# Altium PCB DIO_8SMA_8MCX.PcbDoc (part 7 of 9)
Units mm, origin at the board's own origin, x right, y up, seen from the top; angles counter-clockwise.
Board outline 222.9 x 100 mm, 6 copper layers (TopLayer, L2, L3, L4, L5, Bottom Layer), stack 1.492 mm thick; 542 components, 326 nets, 1968 pads, 1583 vias.
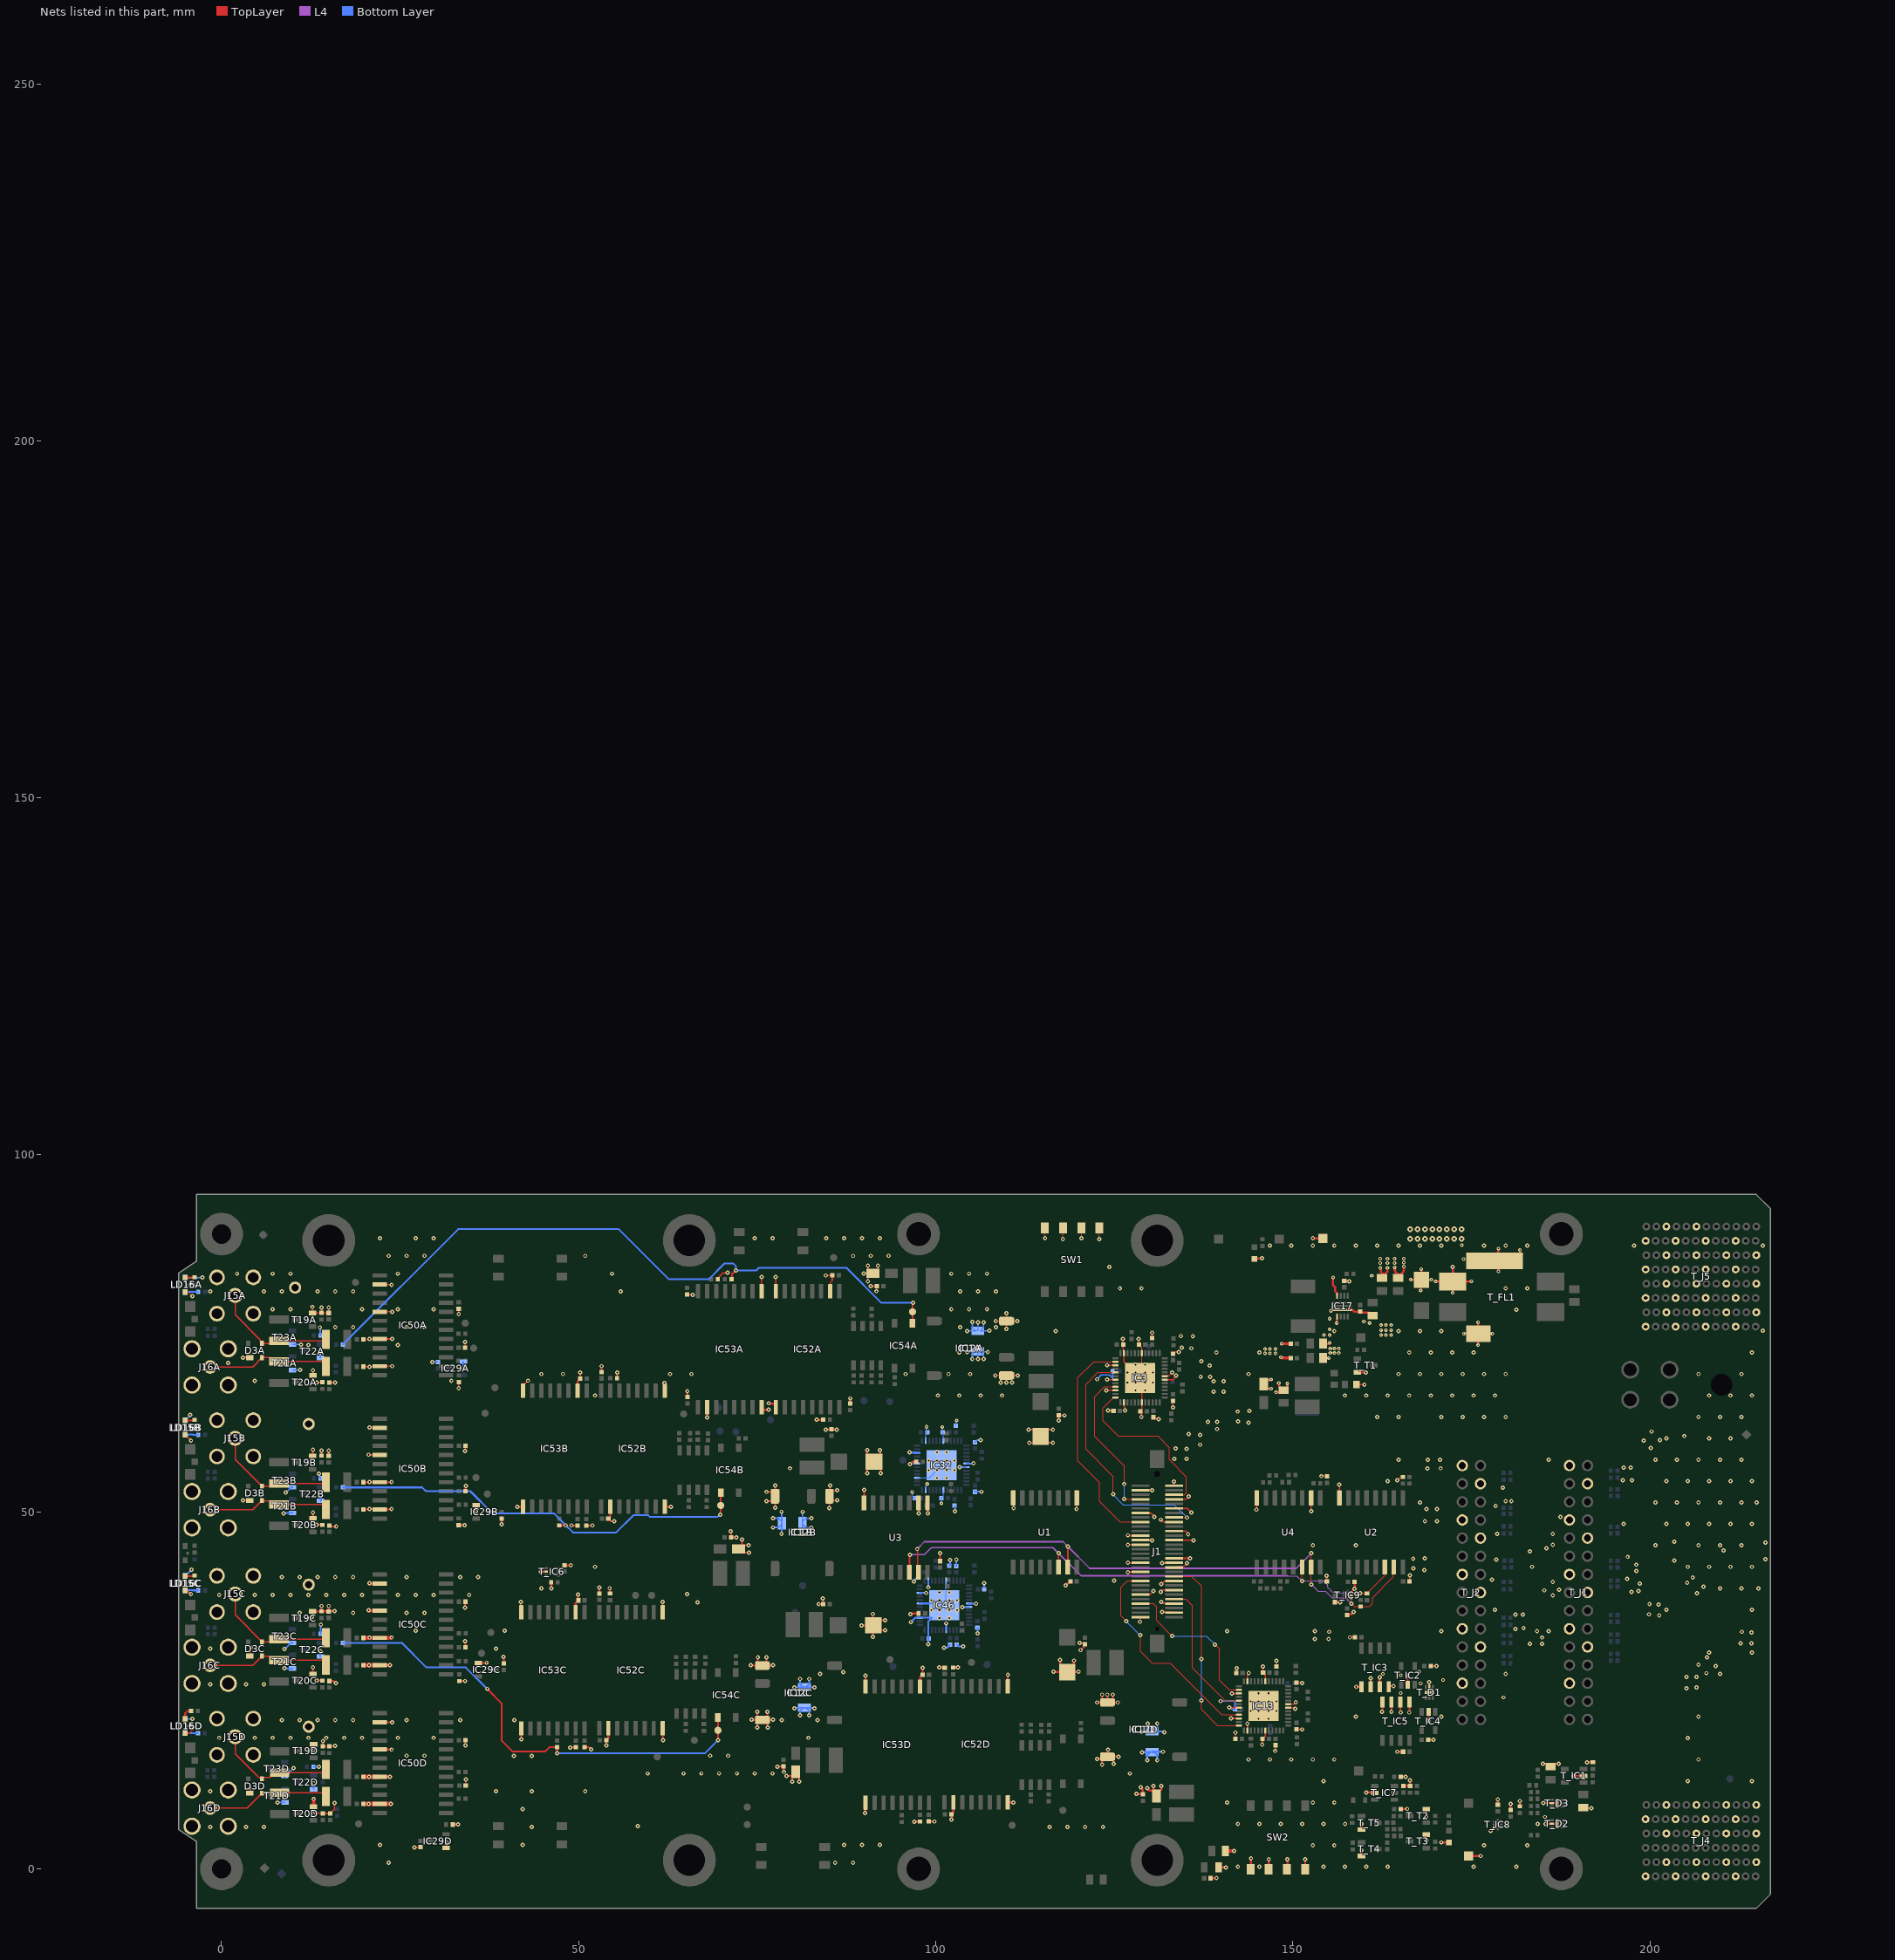
[diagram p10: the nets of this part, all layers, seen from the top]

## Via types
v1: diameter 0.6, hole 0.25, TopLayer to Bottom Layer, tented both sides, 1359 vias
v2: diameter 0.5, hole 0.2, TopLayer to Bottom Layer, tented both sides, 127 vias
v3: diameter 0.6, hole 0.3, TopLayer to Bottom Layer, tented both sides, 45 vias
v4: diameter 0.8, hole 0.3, TopLayer to Bottom Layer, tented both sides, 40 vias
v5: diameter 0.5, hole 0.25, TopLayer to Bottom Layer, tented both sides, 12 vias

## Nets (pads, with @x,y where several pads share a name; then routed paths per layer and width w, separated by ;. In a path a pad name is that pad's centre, name@x,y a point inside that pad or via, vN(x,y) a via of type N, cw(c..) or ccw(c..) an arc to the next point about the centre after c; other vN are vias at no path point) (continued)
GND: C1.2 C2.1 C3.1 C15.1 C16.1 C17.1 C18.1 C19.1 C20.1 C21.1 C22.1 C23.1 C24.1 C25.1 C26.1 C27.1 C39A.2 C39B.2 C39C.2 C39D.2 C41A.1 C41B.1 C41C.1 C41D.1 C54.1 C55.1 C64.1 C65.1 C75.1 C77A.1 C77B.1 C77C.1 C77D.1 C78A.1 C78B.1 C78C.1 C78D.1 C80.1 C81.1 C82.1 C83.1 C84.1 C85.2 C86.1 C87.1 C92.1 C96.1 C97.1 C106.1 C107.1 C108.1 C109.1 C110.1 C111.1 C112.1 C113.1 C114.1 C115.1 C116.1 C117.1 C118.1 IC1A.1 IC1B.1 IC1C.1 IC1D.1 IC3.6 IC3.7 IC3.18 IC3.23 IC3.27 IC3.31 IC3.34 IC3.38 IC3.43 IC3.49 IC12A.1 IC12B.1 IC12C.1 IC12D.1 IC13.6 IC13.7 IC13.18 IC13.23 IC13.27 IC13.31 IC13.34 IC13.38 IC13.43 IC13.49 IC17.3 IC17.4 IC17.11 IC32.6 IC32.7 IC32.18 IC32.23 IC32.27 IC32.31 IC32.34 IC32.38 IC32.43 IC32.49 IC46.6 IC46.7 IC46.18 IC46.23 IC46.27 IC46.31 IC46.34 IC46.38 IC46.43 IC46.49 IC52A.9 IC52B.9 IC52C.9 IC52D.9 IC53A.2 IC53A.8 IC53B.2 IC53B.8 IC53C.2 IC53C.8 IC53D.2 IC53D.8 J1.2 J1.3 J1.8 J1.12 J1.13 J1.18 J1.22 J1.23 J1.25 J1.26 J1.27 J1.34 J1.35 J1.36 J1.38 J1.39 J1.44 J1.48 J1.49 J1.54 J1.58 J1.59 R5.2 R26.2 R53.1 R56.1 R61.2 R69A.1 R69B.1 R69C.1 R69D.1 R86.1 R103.2 R209A.2 R209B.2 R209C.2 R209D.2 SW1.5 SW1.6 SW1.7 SW1.8 SW2.1 SW2.2 SW2.3 SW2.4 T_C1.1 T_C2.1 T_C3.1 T_C4.1 T_C5.1 T_C6.1 T_C8.1 T_C9.1 T_C10.1 T_C12.2 T_C13.2 T_C16.1 T_C20.1 T_C22.1 T_C23.1 T_C24.1 T_C25.1 T_D1.2 T_D1.7 T_D2.2 T_D2.7 T_D3.2 T_D3.7 T_D5.2 T_FL1.4 T_IC1.2 T_IC2.2 T_IC3.1 T_IC3.2 T_IC3.3 T_IC3.4 T_IC4.2 T_IC5.1 T_IC5.2 T_IC5.3 T_IC5.4 T_IC6.2 T_IC7.2 T_IC8.4 T_IC9.4 T_J1.1 T_J1.4 T_J1.7 T_J1.10 T_J1.13 T_J1.16 T_J1.19 T_J1.22 T_J1.25 T_J2.1 T_J2.4 T_J2.7 T_J2.10 T_J2.13 T_J2.16 T_J2.19 T_J2.22 T_J2.25 T_J4.A2 T_J4.A4 T_J4.A6 T_J4.C1 T_J4.C5 T_J4.D2 T_J4.D4 T_J4.D6 T_J4.F1 T_J4.F5 T_J4.G2 T_J4.G4 T_J4.G6 T_J4.I1 T_J4.I5 T_J4.J2 T_J4.J4 T_J4.J6 T_J4.L1 T_J4.L5 T_J5.A2 T_J5.A4 T_J5.A6 T_J5.C1 T_J5.C3 T_J5.C5 T_J5.C7 T_J5.D2 T_J5.D4 T_J5.D6 T_J5.F1 T_J5.F3 T_J5.F5 T_J5.F7 T_J5.G2 T_J5.G4 T_J5.G6 T_J5.G8 T_J5.I1 T_J5.I3 T_J5.I5 T_J5.I7 T_J5.J2 T_J5.J4 T_J5.J6 T_J5.J8 T_J5.L1 T_J5.L3 T_J5.L5 T_J5.L7 T_LD3.1 T_LD4.1 T_R7.1 T_R19.1 T_R25.1 T_R26.2 T_R27.2 T_R30.1 T_R69.1 T_T1.2 T_T2.2 T_T3.2 T_T4.2 T_T5.2 T_TP5.1 T_TP6.1 U1.1 U1.8 U2.8 U3.1 U3.2 U3.8 U4.2 U4.8 | length 399.5
  TopLayer w0.15: SW1.8@115.29,89.75 115.29,88.31 v1(115.3,88.3) ; v1(117.8,88.2) 117.8,89.72 SW1.7@117.83,89.75 ; SW1.6@120.37,89.75 120.4,89.72 v1(120.4,88.3) ; v1(122.9,88.2) 122.9,89.74 SW1.5@122.91,89.75 ; IC3.49@128.858,69.017 IC3.18@128.858,72.217 128.858,72.961
  TopLayer w0.2: IC53B.8@42.223,66.957 42.423,67.157 42.423,67.887 v1(42.914,68.378) ; v1(65.212,66.9) 65.24,66.872 C78A.1@65.24,66.078 ; IC53A.2@67.984,65.142 67.992,65.134 67.992,63.208 v1(68,63.2) ; v1(85.1,50.5) 85.128,50.528 IC12B.1@85.128,52.1 ; IC12B.1@85.128,52.229 IC12B.1@85.128,52.1 ; IC12B.1@85.128,52.491 IC12B.1@85.2,52.563 ; IC12B.1@85.2,52.491 IC12B.1@85.2,52.563 ; v1(85.2,53.7) IC12B.1@85.2,52.563 ; v1(86.2,51.6) 85.628,51.6 IC12B.1@85.128,52.1 ; v1(86.2,53) 86.191,52.991 85.628,52.991 IC12B.1@85.2,52.563 ; v1(108.337,69.083) 108.35,69.095 109.6,69.095 109.1,68.595 v1(109.1,68.1) ; IC12A.1@109.845,69.095 109.9,69.04 v1(109.9,68.1) ; v1(110.7,68.1) 110.645,68.155 110.645,68.595 110.145,69.095 111.495,69.095 v1(111.5,69.1) ; U1.8@110.855,51.95 110.877,51.927 110.877,50.523 v1(110.9,50.5) ; v1(119.7,50.4) 119.734,50.434 119.734,51.939 U1.1@119.745,51.95 ; v1(123.9,67) 123.917,67.017 IC3.34@125.158,67.017 ; v1(124.002,70.525) 124.01,70.517 IC3.27@125.158,70.517 ; v1(124.02,68.543) 124.046,68.517 IC3.31@125.158,68.517 ; v1(124.1,64.2) 124.112,64.188 124.842,64.188 C108.1@124.888,64.142 ; v1(126.2,74.2) 126.224,74.176 126.224,73.426 C107.1@126.25,73.4 126.25,72.652 126.358,72.544 IC3.23@126.358,72.217 126.358,71.017 IC3.49@128.608,68.767 ; IC3.38@126.358,65.317 126.358,64.766 126.49,64.635 126.49,64.243 v1(126.518,64.215) ; v1(126.9,41.56) 126.932,41.593 J1.39@128.65,41.593 ; v1(126.9,42.9) 126.934,42.866 128.647,42.866 J1.35@128.65,42.863 ; v1(126.9,45.4) 126.902,45.403 J1.27@128.65,45.403 ; v1(126.9,46.7) 126.928,46.673 J1.23@128.65,46.673 ; v1(128.4,74.2) 128.424,74.176 128.424,73.426 C106.1@128.45,73.4 128.82,73.03 128.82,72.999 128.858,72.961 ; v1(128.6,34.6) 128.602,34.602 128.602,35.194 J1.59@128.65,35.243 ; J1.49@128.65,38.418 128.691,38.458 130.058,38.458 v1(130.5,38.9) ; J1.25@128.65,46.038 128.669,46.019 130.281,46.019 v1(130.3,46) ; J1.13@128.65,49.848 128.673,49.824 130.143,49.824 130.616,49.351 v1(130.616,49.309) ; J1.3@128.65,53.023 128.661,53.011 130.289,53.011 v1(130.3,53) ; C109.1@128.65,64.1 128.858,64.308 IC3.43@128.858,65.317 128.858,68.517 IC3.49@128.608,68.767 ; IC3.49@128.858,69.017 IC3.49@128.608,68.767 ; C92.1@130.287,74.319 130.295,74.326 130.295,75.095 v1(130.3,75.1) ; v1(131.497,38.774) 131.521,38.774 131.8,39.053 J1.48@133.35,39.053 ; v1(131.5,48.9) 131.823,48.578 J1.18@133.35,48.578 ; v1(131.6,37.4) 131.649,37.4 131.902,37.148 J1.54@133.35,37.148 ; v1(131.6,39.894) 131.6,39.9 131.962,40.262 133.289,40.262 J1.44@133.35,40.323 ; v1(131.7,36) 131.761,35.939 133.289,35.939 J1.58@133.35,35.878 ; v1(131.7,42.8) 131.731,42.831 133.319,42.831 J1.36@133.35,42.863 ; IC3.6@132.058,68.517 133.217,68.517 133.564,68.864 133.564,68.998 v1(133.64,69.074) ; IC3.7@132.058,69.017 132.617,69.017 v1(133.1,69.5) ; v1(133.2,64.6) C64.1@133.2,65.55 ; C65.1@133.2,72.15 133.41,72.36 133.487,72.36 133.527,72.4 v1(134,72.4) ; v1(133.33,54.257) 133.33,53.677 J1.2@133.35,53.658 ; J1.38@133.35,42.228 133.425,42.303 134.7,42.303 v1@135.198,42.8 ; J1.34@133.35,43.498 135.598,43.498 v1(135.6,43.5) ; J1.26@133.35,46.038 136.062,46.038 v1(136.1,46) ; J1.22@133.35,47.308 133.354,47.304 134.996,47.304 135.255,47.045 135.255,46.936 v1(135.332,46.859) ; J1.12@133.35,50.483 135.217,50.483 v1(135.8,49.9) ; J1.8@133.35,51.753 133.363,51.766 135.066,51.766 135.404,52.104 v1(135.404,52.16) ; v1(141.119,22.619) 141.169,22.569 IC13.31@142.45,22.569 ; v1(141.361,21.074) 142.445,21.074 IC13.34@142.45,21.069 ; v1(141.477,24.539) 142.049,24.539 142.06,24.55 142.431,24.55 IC13.27@142.45,24.569 ; v1(141.965,19.087) 141.969,19.084 C116.1@141.969,18.219 ; C115.1@142.069,27.419 142.154,27.504 v1(142.154,28.084) ; v1(143.639,20.35) 143.669,20.319 143.669,19.388 IC13.38@143.65,19.369 ; IC13.23@143.65,26.269 143.65,27.166 143.825,27.342 v1(143.825,27.45) ; v1(144.9,50.3) 144.955,50.355 U4.8@144.955,51.95 ; v1(145.719,17.419) 145.743,17.443 145.743,18.193 C117.1@145.769,18.219 146.15,18.6 IC13.43@146.15,19.369 ; v1(145.819,28.319) 145.841,28.297 C114.1@145.841,27.466 146.15,27.157 IC13.18@146.15,26.269 ; v1(147.519,16.519) 147.538,16.538 147.538,17.271 C118.1@147.581,17.314 ; C113.1@147.677,28.358 147.719,28.401 v1(147.719,29.119) ; IC13.6@149.35,22.569 150.061,22.569 150.211,22.419 v1(150.319,22.419) ; IC13.7@149.35,23.069 150.102,23.069 150.352,23.319 v1(150.419,23.319) ; C111.1@150.519,19.569 150.544,19.543 151.294,19.543 v1(151.319,19.519) ; C112.1@150.519,26.069 150.544,26.043 151.294,26.043 v1(151.319,26.019) ; U4.2@152.575,51.95 152.575,50.125 v1(152.6,50.1) ; v1(154,55) 154.015,54.985 R86.1@154.808,54.985 ; v1(154.737,41.031) 154.758,41.01 154.758,40.236 C55.1@154.76,40.234 ; v1(156.5,53.8) 156.523,53.777 U2.8@156.523,51.95 ; R53.1@158.889,67.829 159.984,67.829 v1(160.013,67.8) ; v1(164.6,54.4) 164.978,54.778 165.305,54.778 R56.1@165.424,54.897 ; C2.1@166.35,40.282 166.368,40.3 v1(166.368,41.098) ; T_C1.1@190.7,8.6 190.8,8.5 v1(191.8,8.5) v1@191.807,8.493
  TopLayer w0.25: v1(41.9,37.4) 41.928,37.372 41.928,35.952 IC53C.8@41.955,35.925 ; IC53B.2@49.843,66.957 49.843,68.257 C78B.1@50.218,68.632 50.218,69.482 v1(50.2,69.5) ; v1(52.9,39.4) 52.926,39.374 C77C.1@52.926,38.563 ; C77B.1@53.2,69.583 v1(53.2,70.4) ; v1@54.361,39.28 54.361,38.609 R209C.2@54.4,38.57 ; v1(55.4,69.5) 55.4,68.87 R209B.2@55.47,68.8 ; IC52C.9@61.771,35.938 v1(61.771,37.361) ; v1(62,68.055) 62.022,68.033 62.022,66.98 IC52B.9@62.045,66.958 ; v1(74.1,28.5) 74.119,28.481 IC1C.1@75.475,28.481 ; v1(75.1,29.6) 75.1,28.856 IC1C.1@75.475,28.481 ; IC1C.1@75.729,28.481 IC12C.1@75.679,28.481 IC1C.1@75.475,28.481 ; v1(76.3,29.6) 76.3,28.856 75.925,28.481 77.181,28.481 v1(77.2,28.5) ; v1(83.6,37.1) C41C.1@84.25,37.1 84.225,37.125 84.225,37.848 v1(84.2,37.873) ; v1(89.6,34.1) C39C.2@91.25,34.1 ; U3.8@89.955,51.25 89.955,53.055 v1(90,53.1) ; IC53D.8@90.155,25.525 90.155,27.065 v1(90.158,27.068) ; v1(91.2,32.5) 91.2,34.05 C39C.2@91.25,34.1 ; v1(91.2,35.7) 91.2,34.15 C39C.2@91.25,34.1 ; v1(92.9,33.4) 91.95,33.4 C39C.2@91.25,34.1 ; v1(92.9,34.8) 91.95,34.8 C39C.2@91.25,34.1 ; v1(96.408,56.708) 96.411,56.708 96.717,57.014 R61.2@97.252,57.014 ; v1(96.446,35.666) 96.541,35.666 96.637,35.761 R103.2@97.576,35.761 ; U3.2@97.575,51.25 97.588,51.237 97.588,49.812 v1(97.6,49.8) ; IC53D.2@97.775,25.525 97.775,26.825 C78D.1@98.15,27.2 v1@98.15,28.139 ; U3.1@98.845,51.25 98.872,51.223 98.872,49.828 v1(98.9,49.8) ; v1(100.5,28.2) 100.509,28.191 101.241,28.191 C77D.1@101.25,28.183 ; C54.1@100.6,43.25 v1(100.6,44.2) ; R209D.2@102.458,28.197 102.46,28.198 103.098,28.198 v1(103.1,28.2) ; IC52D.9@110.095,25.558 110.095,27.195 v1(110.1,27.2) ; v1(113,61.5) 113.75,61.5 C39A.2@114.7,60.55 ; v1(113.1,59.7) 113.85,59.7 C39A.2@114.7,60.55 ; v1(116.4,59.7) 115.55,59.7 C39A.2@114.7,60.55 ; v1(116.4,61.5) 115.65,61.5 C39A.2@114.7,60.55 ; v1(117.2,62.8) C41A.1@117.2,63.55 117.225,63.525 117.975,63.525 v1(118,63.5) ; v1(118.189,39.695) 118.564,40.07 118.661,40.07 C75.1@118.846,40.255 ; v1(120.176,31.645) 120.243,31.578 120.715,31.578 120.801,31.492 120.751,31.443 120.751,31.062 120.322,30.632 v1(120.269,30.632) ; v1(122.6,23.3) IC1D.1@123.701,23.3 ; v1(123.3,24.4) 123.326,24.374 123.326,23.696 IC1D.1@123.701,23.321 ; v1(124.033,24.403) 124.054,24.381 IC1D.1@124.054,23.321 ; IC1D.1@124.408,23.3 v1(125.5,23.3) ; IC1D.1@124.408,23.321 124.783,23.696 124.783,24.383 v1(124.8,24.4) ; v1(128.798,63.3) 128.812,63.314 128.812,64.062 C109.1@128.825,64.075 ; C110.1@130.5,63.25 130.685,63.065 131.004,63.065 131.09,62.979 v1(131.185,62.979) ; v1(157.994,32.406) 157.997,32.408 158.704,32.408 T_C4.1@158.707,32.411 ; v1(162.5,22) 162.525,22.025 T_IC5.4@162.525,23.375 ; T_IC5.3@163.795,23.375 163.8,23.37 v1(163.8,22) ; v1(164.6,16.4) T_C6.1@165.45,16.4 ; T_IC5.2@165.065,23.375 165.065,21.935 v1(165.1,21.9) ; T_IC2.2@166.1,25.8 v1(166.1,27.072) ; v1(166.3,21.9) 166.335,21.935 T_IC5.1@166.335,23.375 ; T_C5.1@168.95,18.1 v1(169.7,18.1) ; v1(169,20.78) T_IC4.2@169,22 ; v1(169.063,26.163) 169.082,26.144 169.082,25.478 T_D1.2@169.1,25.46 T_D1.7@169.1,24.7 ; T_C3.1@169.3,28.4 v1(170.1,28.4) ; v1(185,14.7) 186.1,14.7 v1(187.2,14.7) ; v1(185.071,9.231) 185.102,9.2 T_D3.7@187,9.2 ; v1(185.4,6.3) T_D2.2@186.24,6.3 T_D2.7@187,6.3 ; v1(189.368,13.013) 189.387,13.032 T_IC1.2@190.698,13.032
  TopLayer w0.3: v1(44.7,41.6) T_IC6.2@45.462,41.6 ; T_R25.1@46.139,40.119 46.17,40.089 46.17,39.33 v1(46.2,39.3) ; T_C8.1@47.998,42.536 48.034,42.5 v1(48.9,42.5) ; IC53C.2@49.575,35.925 49.575,37.225 C78C.1@49.95,37.6 49.925,37.625 49.925,38.375 v1(49.9,38.4) ; IC53A.8@75.604,65.096 IC53A.8@75.604,64.642 75.604,64.459 75.754,64.309 76.591,64.309 v1(76.6,64.3) ; v1(76.6,65.2) 76.681,65.2 76.739,65.142 IC52A.9@77.605,65.142 ; v1(83.329,62.892) 84.222,62.892 R209A.2@84.23,62.9 ; v1(84.605,61.512) 84.607,61.514 85.401,61.514 85.424,61.537 86.112,61.537 v1(86.125,61.524) ; C77A.1@88,65.15 88.008,65.158 88.008,65.872 v1(88.015,65.88) ; v1(90.4,58.655) 90.4,57.95 C39B.2@91.35,57 ; v1(90.4,55.4) 90.401,56.051 C39B.2@91.35,57 ; v1(92.2,58.655) 92.2,57.85 C39B.2@91.35,57 ; v1(92.3,55.4) 92.3,56.05 C39B.2@91.35,57 ; v1(116.5,27.6) 118.35,27.6 C39D.2@118.4,27.55 ; v1(117.388,29.236) 117.388,29.155 117.463,29.08 117.463,28.575 118.338,27.7 118.478,27.7 119.353,28.575 119.353,29.146 v1(119.376,29.169) ; C39D.2@118.55,27.6 v1(120,27.6) ; T_C12.2@138.496,-1.314 138.503,-1.307 139.293,-1.307 v1(139.3,-1.3) ; T_R26.2@139.6,0.2 v1(140.6,0.2) ; SW2.1@144.09,-0.05 144.133,-0.007 v1(144.133,1.45) ; T_LD3.1@144.55,85.5 T_LD3.1@144.6,85.45 144.65,85.5 v1(145.7,85.5) ; SW2.2@146.63,-0.05 146.633,-0.047 v1(146.633,1.35) ; v2(146.943,67.25) 146.418,67.25 145.943,67.725 C85.2@145.943,67.9 145.943,67.974 146.418,68.449 146.842,68.449 v2(146.943,68.55) ; v2(147.643,66.75) 148.393,66.75 C84.1@148.693,67.05 ; v2(148.043,68.05) 148.043,67.7 148.143,67.6 148.143,67.425 148.518,67.05 C84.1@148.693,67.05 ; SW2.3@149.17,-0.05 149.233,0.013 v1(149.233,1.35) ; v2(149.243,67.95) 149.243,67.425 148.868,67.05 C84.1@148.693,67.05 ; SW2.4@151.71,-0.05 151.733,-0.027 v1(151.733,1.35) ; v1(152.8,88.3) T_TP5.1@154.2,88.3 ; v2(155.343,78.15) 155.493,78.3 IC17.3@156.943,78.3 158.343,78.3 158.593,78.05 C86.1@159.443,78.05 159.596,77.897 160.621,77.897 161.018,77.5 C87.1@161.193,77.5 ; v2(155.643,82.85) 155.593,82.8 155.593,81.8 155.897,81.496 155.897,80.922 156.193,80.626 IC17.11@156.193,80.25 ; T_C24.1@155.875,37.35 155.9,37.325 156.575,37.325 v1(156.6,37.3) ; v2@156.193,76.5 IC17.4@156.193,77.35 ; C1.2@157.2,82.35 157.225,82.325 157.875,82.325 v1(157.9,82.3) ; T_C25.1@157.6,35.55 157.703,35.653 158.153,35.653 v1(158.5,36) ; T_IC9.4@158.15,38.7 158.2,38.7 158.225,38.725 158.225,38.775 158.645,39.195 T_R69.1@158.645,40.2 ; v1(158.9,25.5) T_IC3.1@159.62,25.5 ; T_T1.2@159.05,69.55 160.15,69.55 v1(160.2,69.5) ; v1(159.6,2.6) 159.6,1.817 T_T4.2@159.618,1.8 ; v1(159.6,6.3) 159.6,5.517 T_T5.2@159.618,5.5 ; v1(160.3,10.7) 161.432,10.7 T_IC7.2@161.5,10.633 ; T_IC3.2@160.89,25.5 160.895,25.505 160.895,26.695 v1(160.9,26.7) ; T_IC3.3@162.16,25.5 162.161,25.501 162.161,26.761 v1(162.2,26.8) ; v2(162.243,84.15) 162.326,84.067 162.326,83.57 162.655,83.242 162.83,83.242 163.23,83.642 163.23,83.817 163.243,83.831 v2(163.243,84.15) ; T_IC3.4@163.43,25.5 163.53,25.6 v1(164.1,25.6) ; v2(164.243,84.25) 164.243,83.904 164.33,83.817 164.33,83.642 164.73,83.242 165.08,83.242 165.48,83.642 165.48,83.817 165.543,83.881 v2(165.543,84.35) ; T_C20.1@165.098,12.89 165.103,12.895 165.795,12.895 v1(165.8,12.9) ; T_C16.1@165.105,8.355 165.15,8.4 v1(166,8.4) ; T_C13.2@165.467,11.6 165.477,11.61 T_R30.1@166.419,11.61 166.414,11.615 166.414,12.386 v1(166.4,12.4) ; v2@166.488,82.508 v2(166.496,82.5) T_D5.2@168,82.5 ; v2(167.888,81.008) 167.956,81.076 167.956,82.456 T_D5.2@168,82.5 ; v2(167.988,84.008) 168,83.996 T_D5.2@168,82.5 ; T_T2.2@168.668,8.378 168.7,8.345 168.7,7.362 v1(168.685,7.347) ; T_T3.2@168.682,4.8 168.7,4.783 v1(168.7,4) ; v2(169.388,82.508) 169.381,82.5 T_D5.2@168,82.5 ; v2@169.995,82.293 v2(170.02,82.268) T_FL1.4@172.395,82.268 ; v1(170.8,3.7) 170.813,3.687 T_LD4.1@171.844,3.687 ; v2(172.395,80.693) T_FL1.4@172.395,82.268 ; v1(172.4,84.3) 172.395,84.295 172.395,83.893 T_FL1.4@172.395,82.268 ; v2(173.946,74.942) 173.972,74.968 175.897,74.968 T_FL1.4@175.946,75.017 ; T_FL1.4@174.5,85.375 174.525,85.35 178.65,85.35 T_FL1.4@178.75,85.25 ; v2@174.795,82.293 174.77,82.268 T_FL1.4@172.395,82.268 ; T_TP6.1@174.9,1.8 v1(176.3,1.8) ; v2(175.946,73.342) T_FL1.4@175.946,75.017 ; v2(175.946,76.542) T_FL1.4@175.946,75.017 ; v1(177.7,5.3) 177.725,5.3 178.15,5.725 178.15,5.775 178.175,5.8 T_IC8.4@178.225,5.8 ; v2(177.946,74.942) 177.92,74.968 T_FL1.4@175.995,74.968 T_FL1.4@175.946,75.017 ; T_C22.1@178.7,8.957 v1(178.7,9.7) ; v2(178.8,83.675) 178.75,83.725 T_FL1.4@178.75,85.25 ; v2(178.8,86.875) 178.75,86.825 T_FL1.4@178.75,85.25 ; T_C23.1@180.5,8.25 v1(180.5,9.1) ; v2(181.8,86.675) 181.8,86.25 180.8,85.25 T_FL1.4@178.75,85.25 ; T_R19.1@181.8,8.77 v1(181.8,9.5) ; v1(191.2,14.9) 191.222,14.922 192.006,14.922 T_R7.1@192.018,14.933
  TopLayer w0.4: v2(148.343,71.65) 148.443,71.55 149.343,71.55 ; v2(148.443,73.55) 149.343,73.55 ; C82.1@154.243,71.55 v2(155.043,71.55) ; C83.1@154.243,73.55 155.043,73.55 v2(155.143,73.65) ; v2(156.143,76.45) v2@156.193,76.5
  TopLayer w0.5: T_R27.2@140.55,2.5 v1(141.8,2.5)
  Bottom Layer w0.15: v1(96.408,56.708) 96.458,56.758 IC32.31@97.393,56.758 ; v2(96.695,52.793) 96.695,52.698 96.811,52.582 96.811,52.256 96.815,52.252 96.815,52.135 97.042,51.908 C20.1@97.158,51.908 ; IC32.27@97.393,54.758 99.093,54.758 IC32.49@100.843,56.508 100.238,57.113 IC32.49@100.238,57.324 ; IC32.23@98.593,53.058 98.593,53.65 98.8,53.858 v2(98.8,53.9) ; IC32.38@98.593,59.958 98.593,60.939 C21.1@98.821,61.167 98.708,61.28 v2(98.708,61.908) ; v2(100.808,51.208) 100.808,51.876 C19.1@100.789,51.896 101.093,52.199 IC32.18@101.093,53.058 ; v2(100.931,61.899) 100.967,61.864 C96.1@100.967,61.135 101.093,61.009 IC32.43@101.093,59.958 ; IC46.49@101.209,36.911 101.459,37.161 IC46.43@101.459,40.361 ; C97.1@102.808,62.058 102.808,62.578 102.944,62.714 v2(102.944,62.808) ; v1@120.373,88.273 v1(120.4,88.3)
  Bottom Layer w0.2: v1(81.3,46.9) 81.35,46.95 81.35,48.275 81.825,47.8 v1(82.6,47.8) ; R69B.1@81.35,48.4 R69B.1@81.35,48.625 ; v1(81.356,49.999) 81.35,49.992 R69B.1@81.35,48.625 ; v1(82.6,49.1) 81.825,49.1 R69B.1@81.35,48.625 ; C18.1@102.618,50.867 102.7,50.785 v1(102.7,50.1) ; v1(104.4,72.4) 104.45,72.45 105.609,72.45 105.134,71.975 105.134,71.434 v1(105.1,71.4) ; v1(105.9,71.4) R69A.1@105.9,72.45 ; R69A.1@106.191,72.416 R69A.1@106.208,72.433 ; R69A.1@106.191,72.45 R69A.1@106.208,72.433 ; v1(106.7,71.4) 106.666,71.434 106.666,71.975 R69A.1@106.208,72.433 ; v1(107.3,72.4) 107.266,72.434 106.209,72.434 R69A.1@106.208,72.433 ; v1(122.578,68.563) 123.174,69.159 124.328,69.159 124.767,68.72 ; R5.2@124.765,69.669 124.767,69.667 124.767,68.72 ; 124.767,68.7 124.767,68.72 ; v1(139.86,23.488) 141.749,23.488 141.904,23.332 141.904,22.36 141.421,22.36 141.161,22.619 v1(141.119,22.619)
  Bottom Layer w0.25: v1(80.2,25.4) 80.224,25.424 81.574,25.424 R69C.1@81.6,25.45 81.45,25.45 81,25.9 v1(81,26.6) ; R69C.1@81.85,25.424 82.976,25.424 v1(83,25.4) ; R69C.1@81.85,25.45 82.3,25.9 v1(82.3,26.6) ; v1(96.515,34.546) 96.515,34.549 97.128,35.161 IC46.27@97.759,35.161 99.459,35.161 98.959,34.661 IC46.23@98.959,33.461 98.959,32.298 C24.1@98.996,32.261 98.971,32.236 v1@98.971,31.486 ; v1(96.94,40.247) 96.94,40.34 97.54,40.94 C25.1@97.54,41.56 ; IC46.34@97.759,38.661 98.616,38.661 v1(98.646,38.632) ; IC46.38@98.959,40.361 98.955,40.357 98.955,39.442 v1(98.974,39.423) ; v1(101.146,30.961) 101.149,30.965 101.578,30.965 C23.1@102.023,31.409 ; v1(101.446,34.361) 101.459,34.348 IC46.18@101.459,33.461 ; C26.1@101.9,42.45 101.957,42.45 102,42.493 v1(102,43.263) ; C27.1@102.846,42.411 102.846,43.245 v1(102.9,43.299) ; C22.1@102.946,31.411 103.196,31.161 v1(103.846,31.161) ; v1(103.344,56.267) 104.283,56.267 IC32.7@104.293,56.258 ; v1(103.746,36.661) IC46.7@104.659,36.661 ; IC32.6@104.293,56.758 105.228,56.758 v1(105.278,56.808) ; IC46.6@104.659,37.161 v1(105.646,37.161) ; C17.1@105.408,52.808 C17.1@105.508,52.808 v1(106.408,52.808) ; C16.1@105.508,59.758 105.817,60.067 v1(106.295,60.067) ; C15.1@105.833,33.771 105.846,33.758 v1(105.846,32.961) ; v1(106.77,40.008) 106.796,39.982 C3.1@106.796,39.361 ; v1(128.8,19.2) 128.85,19.25 R69D.1@130.15,19.25 ; v1(129.7,20.354) 129.7,19.7 R69D.1@130.15,19.25 ; R69D.1@130.3,19.25 R69D.1@130.15,19.25 ; v1(131,20.354) 131,19.7 130.55,19.25 131.755,19.25 131.905,19.1 v1(132,19.1)
  Bottom Layer w0.3: v1(96.308,58.308) 97.043,58.308 97.093,58.258 IC32.34@97.393,58.258 IC32.34@97.68,58.258 ; IC46.31@97.759,37.161 99.259,37.161 99.4,37.302 v1(99.4,37.6)
  other v1: 142.3,0.3 145.3,0.3 154.3,0.3 157.3,0.3 160.3,0.3 163.3,0.3 175.3,0.3 181.3,0.3 152.8,3.3 155.8,3.3 182.8,3.3 176.8,3.32 142.3,6.3 145.3,6.3 148.3,6.3 151.3,6.3 154.3,6.3 157.32,6.3 184.3,6.3 140.8,9.3 152.8,9.3 155.8,9.3 154.3,12.3 205.3,12.3 214.3,12.3 143.8,15.3 146.8,15.3 149.8,15.3 152.8,15.3 155.8,15.3 206.8,15.3 205.3,18.3 145.215,20.985 146.585,20.985 158.8,21.3 170.8,21.3 206.8,21.3 144.1,22.1 145.215,22.1 146.585,22.1 147.7,22.1 144.1,23.47 145.215,23.47 146.585,23.47 147.7,23.47 145.215,24.585 146.585,24.585 205.1,25.3 206.5,25.4 205.1,26.9 206.5,26.9 83.8,27.3 179.8,27.3 209.8,27.3 207.9,27.4 87.044,27.544 98.149,28.14 209.2,28.4 206.8,28.6 208,29.6 208.3,30.3 214.3,30.3 98.946,31.461 183.2,31.5 184.9,31.5 212.7,31.6 214.2,31.6 153.1,32.2 155,32.2 184.9,32.4 214.2,33.1 155.1,33.2 212.9,33.2 140.8,33.3 153.1,33.3 170.8,33.3 184.2,33.3 185.8,33.3 181.2,33.6 182.3,33.7 100.515,35.115 101.885,35.115 201.3,35.5 181.2,35.6 182.2,35.6 199.887,35.64 99.4,36.23 100.515,36.23 101.885,36.23 103,36.23 178.3,36.3 202.3,36.3 214.3,36.3 201.2,37 199.953,37.072 66.64,37.32 100.515,37.6 101.885,37.6 103,37.6 186.4,38.3 65.2,38.5 206.6,38.6 100.515,38.715 101.885,38.715 197.4,38.8 198.4,38.9 185.2,39 187.3,39.1 158.638,39.21 44.8,39.3 209.8,39.3 212.8,39.3 215.18,39.3 54.333,39.308 207.5,39.5 198.602,39.949 205.208,40.075 186.4,40.2 125,40.4 177.9,40.5 196.8,40.6 206,40.8 198.1,41.7 168.405,41.829 166.868,42.095 52.3,42.3 183.5,42.3 205.3,42.3 208.3,42.3 211.3,42.3 214.3,42.3 198.1,42.6 135.2,42.8 203.4,43.2 178.5,43.3 216.2,43.383 166.847,43.441 168.446,43.513 196.9,43.7 183.192,44.471 210.3,44.6 185.5,44.9 152.8,45.3 158.8,45.3 200.8,45.3 206.8,45.3 209.8,45.3 212.8,45.3 186.4,45.4 216.2,45.7 203.4,45.8 178.6,46.9 186.4,46.9 196.3,48.3 202.3,48.3 205.3,48.3 208.3,48.3 211.3,48.3 214.3,48.3 168.5,48.7 170.2,48.7 187.456,49.313 168.7,50.4 170.2,50.4 178.4,50.8 167.8,51.3 200.8,51.3 203.8,51.3 206.8,51.3 209.8,51.3 212.8,51.3 214.93,51.3 179.8,51.5 180.6,51.5 179.4,53.4 163.3,54.3 202.3,54.3 205.3,54.3 208.3,54.3 211.3,54.3 214.3,54.3 196.2,54.4 197.5,54.4 100.157,54.708 101.527,54.708 99.042,55.823 100.157,55.823 101.527,55.823 102.642,55.823 168.859,56.059 79.6,56.1 170.7,56.1 196.3,56.2 197.3,56.2 99.042,57.193 100.157,57.193 101.527,57.193 102.642,57.193 164.8,57.3 168.9,57.3 170.6,57.3 185.8,57.3 200.8,57.3 203.8,57.3 206.8,57.3 209.8,57.3 212.8,57.3 133.4,57.4 135.1,57.4 100.157,58.308 101.527,58.308 135.1,58.8 133.6,58.9 200.113,58.935 137,59.4 199.145,59.962 201.379,60.026 202.3,60.3 208.3,60.3 211.3,60.3 204.83,60.619 137,60.8 135.4,60.9 200.253,61.234 139.399,61.599 143.8,62.5 138.099,62.599 139.399,62.599 142.334,62.69 161.8,63.3 164.8,63.3 170.8,63.3 173.8,63.3 176.8,63.3 179.8,63.3 206.8,63.3 209.8,63.3 212.8,63.3 142.28,64.04 143.901,64.117 52.3,66.3 100.3,66.3 103.3,66.3 106.3,66.3 109.3,66.3 157.3,66.3 160.3,66.3 163.3,66.3 166.3,66.3 169.3,66.3 172.3,66.3 175.3,66.3 178.3,66.3 208.3,66.3 211.3,66.3 214.3,66.3 138.9,66.8 140.3,66.8 127.958,66.999 129.328,66.999 126.843,68.114 127.958,68.114 129.328,68.114 130.443,68.114 138.9,68.3 140.3,68.3 137.1,68.9 138.4,68.9 44.8,69.3 47.8,69.3 62.8,69.3 65.8,69.3 95.8,69.3 101.8,69.3 104.8,69.3 143.8,69.3 164.8,69.3 167.8,69.3 170.8,69.3 173.8,69.3 176.8,69.3 179.8,69.3 206.8,69.3 212.8,69.3 126.843,69.484 127.958,69.484 129.328,69.484 130.443,69.484 138.347,70.503 127.958,70.599 129.328,70.599 137.2,71.1 103.3,72.3 139.3,72.3 145.3,72.3 166.3,72.3 169.3,72.3 172.3,72.3 175.3,72.3 214.3,72.3 135.8,72.9 134.428,73.012 134.328,74.612 136,74.6 116.8,75.3 155.8,75.3 164.8,75.3 167.8,75.3 170.8,75.3 215.8,75.37 181.3,78.3 125.8,81.3 128.8,81.3 179.8,81.3 182.8,81.3 124.3,84.3 146.8,87.3 149.8,87.3 152.8,87.3 155.8,87.3 158.8,87.3 161.8,87.3 164.8,87.3 167.8,87.3 170.8,87.3 176.8,87.3 179.8,87.3 182.8,87.3 197.8,87.3 215.8,87.3
  other v2: 146.1,72.2 146.8,72.2 147.6,72.2 155.243,72.25 155.843,72.25 156.443,72.25 146.1,72.8 146.8,72.8 147.6,72.8 155.243,72.85 155.843,72.85 156.443,72.85 154.343,74.75 155.143,74.75 162.343,74.75 163.043,74.75 163.743,74.75 162.343,75.45 163.043,75.45 163.743,75.45 155.143,75.55 162.343,76.15 163.043,76.15 163.743,76.15 160.743,76.45 159.943,76.65 155.143,77.05 175,82.3 161.043,83.05 162.243,84.85 163.243,84.85 164.243,84.85 165.531,84.903 173.9,85.4 162.243,85.45 163.243,85.45 164.243,85.45 165.543,85.45 173.643,87.35
  other v4: 166.443,88.25 167.476,88.25 168.51,88.25 169.543,88.25 170.543,88.25 171.576,88.25 172.61,88.25 173.643,88.25 166.443,89.55 167.476,89.55 168.51,89.55 169.543,89.55 170.543,89.55 171.576,89.55 172.61,89.55 173.643,89.55
  other v5: 185.3,7.288 179.5,24 165.1,24.6 167.89,25.975 171.017,26.445 165.1,27.1 162.6,27.3 167.7,27.6
GND_ISO1: C32A.1 C33A.1 C42A.2 C43A.1 C56A.1 C76A.1 C88A.1 C95A.1 C100A.1 D3A.1 IC1A.4 IC12A.4 IC29A.1 IC50A.2 IC50A.5 IC50A.8 IC50A.11 IC52A.2 IC52A.8 IC53A.9 J15A.2 J16A.2 LD15A.1 LD16A.1 R69A.2 R202A.1 R206A.1 R210A.1 R214A.1 R218A.2 R219A.2 R223A.1 T19A.2 T20A.2 T21A.2 T22A.2 T23A.2 TP1A.1 | length 58.7
  TopLayer w0.2: LD16A.1@-5.1,80.8 -4.7,80.8 v1(-4.1,80.2) ; v1(3,71.6) D3A.1@3.95,71.6 ; v1(12.7,78.7) 12.75,78.65 T19A.2@12.75,77.85 13.98,77.85 R219A.2@14,77.87 ; T20A.2@12.783,69.1 12.8,69.118 v1(12.8,69.8) ; v1(13.3,68.1) 13.327,68.127 14.072,68.127 R218A.2@14.099,68.154 ; v1(14,78.6) R219A.2@14,77.87 ; v1(15,78.6) C95A.1@15,77.85 14.98,77.87 R219A.2@14,77.87 ; C100A.1@15.093,68.096 15.896,68.096 v1(15.9,68.1) ; R210A.1@19.87,70.335 22.085,70.335 IC50A.11@22.15,70.4 v1(23.9,70.4) ; R206A.1@19.87,74.145 22.085,74.145 IC50A.8@22.15,74.21 23.89,74.21 v1(23.9,74.2) ; IC50A.5@22.15,78.02 23.88,78.02 v1(23.9,78) ; IC50A.2@22.15,81.83 23.77,81.83 v1(23.8,81.8) ; v1(33.2,67.3) 33.218,67.318 R202A.1@33.218,68.169 ; v1(33.2,77.7) C32A.1@33.2,78.45 ; C33A.1@34.1,73 v1(34.1,73.8) ; C88A.1@65.2,80.45 65.231,80.419 65.976,80.419 v1(65.994,80.4) ; R214A.1@69.47,82.6 69.66,82.79 69.66,82.937 70.163,83.44 70.804,83.44 v1(70.848,83.483) ; v1(75.6,82.9) 75.604,82.896 IC53A.9@75.604,81.392 ; v1(77.6,82.9) 77.605,82.895 IC52A.8@77.605,81.392 ; v1(84.6,83.1) 84.607,83.107 C76A.1@85.515,83.107 85.515,82.382 85.225,82.092 IC52A.2@85.225,81.392 ; v1(89.9,83.4) 91.025,83.4 90.5,83.925 v1(90.5,84.5) ; v1(90.5,82.3) 90.509,82.309 90.509,82.875 91.034,83.4 C42A.2@91.2,83.4 91.375,83.4 91.9,83.925 v1(91.9,84.5) ; v1(90.9,81.6) C43A.1@91.75,81.6 91.7,81.55 v1(91.7,80.9) ; v1@108.407,76.707 109.907,76.707 IC1A.4@109.923,76.723 ; v1(109.9,75.6) 109.923,75.623 IC1A.4@109.923,76.723 ; v1(109.9,77.8) 109.923,77.777 IC1A.4@109.923,76.723 ; v1(111.4,76.7) 109.945,76.7 IC1A.4@109.923,76.723
  Bottom Layer w0.2: LD15A.1@-5.1,82.8 -2.707,82.8 v1(-2.691,82.816) ; T21A.2@9.95,69.85 10.95,69.85 v1(11,69.9) ; T23A.2@9.95,73.45 11.05,73.45 v1(11.1,73.4) ; v1(13.773,75.836) 13.8,75.809 13.8,74.77 R223A.1@13.87,74.7 ; v1(13.8,72.3) 13.8,71.6 T22A.2@13.85,71.55 ; v1(29.5,71) 29.509,70.991 C56A.1@30.291,70.991 ; IC29A.1@33.85,71.05 33.85,70.458 34,70.308 v1(34,70.2) ; v1(104.4,75.3) 104.45,75.35 R69A.2@105.675,75.35 ; v1(105.121,76.589) 105.121,75.804 R69A.2@105.575,75.35 ; R69A.2@105.9,75.35 105.9,76.551 v1(105.908,76.559) ; v1@106.7,76.546 106.7,75.942 106.7,75.825 106.225,75.35 107.45,75.35 v1(107.5,75.4)
  other v1: 4.668,68.35 32.168,68.35 20.7,70.3 0.918,70.85 12.168,73.35 24.668,73.35 20.7,74.2 15.918,75.85 18.418,75.85 25.918,75.85 28.418,75.85 103.418,75.85 108.418,75.85 106.713,76.559 108.4,76.7 7.168,78.35 9.668,78.35 19.668,78.35 24.668,78.35 29.668,78.35 102.168,78.35 104.668,78.35 107.168,78.35 -1.582,80.85 5.918,80.85 8.418,80.85 13.418,80.85 15.918,80.85 18.418,80.85 55.918,80.85 103.418,80.85 105.918,80.85 108.418,80.85 2.168,83.35 7.168,83.35 9.668,83.35 24.668,83.35 54.668,83.35 102.168,83.35 104.668,83.35 107.168,83.35 23.418,85.85 25.918,85.85 28.418,85.85 50.918,85.85 88.418,85.85 90.918,85.85 93.418,85.85 22.168,88.35 27.168,88.35 29.668,88.35 74.668,88.35 77.168,88.35 84.668,88.35 87.168,88.35 89.668,88.35 92.168,88.35
GND_ISO2: C32B.1 C33B.1 C42B.2 C43B.1 C56B.1 C76B.1 C88B.1 C95B.1 C100B.1 D3B.1 IC1B.4 IC12B.4 IC29B.1 IC50B.2 IC50B.5 IC50B.8 IC50B.11 IC52B.2 IC52B.8 IC53B.9 J15B.2 J16B.2 LD15B.1 LD16B.1 R69B.2 R202B.1 R206B.1 R210B.1 R214B.1 R218B.2 R219B.2 R223B.1 T19B.2 T20B.2 T21B.2 T22B.2 T23B.2 TP1B.1 | length 50.2
  TopLayer w0.25: LD16B.1@-5.1,60.8 v1(-4.3,60) ; v1(3,51.6) D3B.1@3.95,51.6 ; T19B.2@12.75,57.85 12.751,57.851 12.751,58.651 v1(12.8,58.7) ; T20B.2@12.783,49.1 12.8,49.118 v1(12.8,49.9) ; v1(13.3,48.2) 13.323,48.177 14.076,48.177 R218B.2@14.099,48.154 ; R219B.2@14,57.87 v1(14,58.6) ; C95B.1@15,57.85 v1(15,58.6) ; C100B.1@15.093,48.096 15.245,47.944 16.027,47.944 v1(16.041,47.93) ; R210B.1@19.87,50.335 R210B.1@19.87,50.335 20.636,50.336 v1(20.7,50.4) 20.732,50.368 22.118,50.368 IC50B.11@22.15,50.335 23.735,50.335 v1(23.8,50.4) ; R206B.1@19.87,54.145 IC50B.8@22.15,54.145 23.745,54.145 v1(23.8,54.2) ; v1(20.6,58) 20.645,57.955 IC50B.5@22.15,57.955 ; v1(20.7,61.8) 20.717,61.783 22.133,61.783 IC50B.2@22.15,61.765 ; R202B.1@33.2,48.13 v1(34.03,48.13) ; v1(34.1,58.5) 34.125,58.525 34.125,59.231 C32B.1@34.15,59.256 ; C33B.1@34.15,52.871 34.175,52.896 34.175,53.595 v1(34.2,53.62) ; v1(35.6,50.1) 35.6,50.9 IC29B.1@35.65,50.95 ; v1(39.2,48.25) C56B.1@39.2,49.05 ; v1(41.4,50.7) 41.407,50.707 IC53B.9@42.223,50.707 ; v1(49,48.1) 49.038,48.062 R214B.1@49.868,48.062 ; C88B.1@51.068,48.082 51.882,48.082 v1(51.9,48.1) ; IC52B.2@54.425,50.708 54.425,49.308 C76B.1@54.15,49.033 54.483,48.7 v1(55,48.7) ; IC52B.8@62.045,50.708 62.899,50.708 v1(62.904,50.703) ; v1(71.3,47.3) 71.35,47.25 C43B.1@71.35,46.4 v1(72.1,46.4) ; C42B.2@72.4,44.8 72.9,44.3 73.835,44.3 v1(73.838,44.303) ; v1(72.9,46.1) 72.9,45.3 73.321,45.3 v1(73.8,45.3) ; v1(76.3,51.5) 77.115,51.5 77.49,51.875 IC1B.4@77.49,52.15 77.49,50.61 v1(77.5,50.6) ; v1(76.3,52.8) 77.115,52.8 77.49,52.425 77.49,53.69 v1(77.5,53.7)
  Bottom Layer w0.25: LD15B.1@-5.1,62.8 -4.467,63.433 -4.467,63.533 v1(-4.4,63.6) ; v1(8.7,49.8) 8.75,49.85 T21B.2@9.95,49.85 ; v1(9,52.7) 9.55,53.25 9.75,53.45 T23B.2@9.95,53.45 ; v1(13.605,55.365) 13.605,55.27 13.705,55.17 13.705,54.865 R223B.1@13.87,54.7 ; T22B.2@13.85,51.55 13.9,51.6 v1(13.9,52.3) ; v1(77.2,47.8) 78,47.8 78.45,48.25 R69B.2@78.45,48.4 78.45,46.95 v1(78.4,46.9) ; v1(77.2,49.1) 78,49.1 78.45,48.65 78.45,49.95 v1(78.4,50)
  other v1: 20.7,54.2
GND_ISO3: C32C.1 C33C.1 C42C.2 C43C.1 C56C.1 C76C.1 C88C.1 C95C.1 C100C.1 D3C.1 IC1C.4 IC12C.4 IC29C.1 IC50C.2 IC50C.5 IC50C.8 IC50C.11 IC52C.2 IC52C.8 IC53C.9 J15C.2 J16C.2 LD15C.1 LD16C.1 R69C.2 R202C.1 R206C.1 R210C.1 R214C.1 R218C.2 R219C.2 R223C.1 T19C.2 T20C.2 T21C.2 T22C.2 T23C.2 TP1C.1 | length 57.3
  TopLayer w0.25: LD16C.1@-5.1,39 -4.875,39 -4.489,38.614 -4.414,38.614 v1(-4.3,38.5) ; D3C.1@3.95,29.8 3.95,30.768 4.161,30.979 v2(4.161,31.039) ; v1(12.646,35.239) 12.655,35.249 12.655,35.955 T19C.2@12.75,36.05 13.98,36.05 R219C.2@14,36.07 ; T20C.2@12.783,27.3 12.783,28.183 v1(12.8,28.2) ; v1(13.333,26.381) 13.346,26.368 14.086,26.368 R218C.2@14.099,26.354 ; v1(14,36.8) R219C.2@14,36.07 ; v1(15,36.8) C95C.1@15,36.05 ; C100C.1@15.093,26.296 15.692,26.296 15.988,26 v1(16,26) ; v1(15.8,36.1) 15.775,36.075 15.025,36.075 C95C.1@15,36.05 ; R202C.1@33.3,26.3 v1(34.1,26.3) ; v1(34.1,31.9) 34.158,31.842 C33C.1@34.158,31.029 ; v1(34.1,36.6) 34.104,36.604 C32C.1@34.104,37.414 ; IC29C.1@36.25,28.85 37.092,28.85 v1(37.108,28.866) ; v1(39.473,29.662) 39.5,29.635 C56C.1@39.5,28.75 ; IC53C.9@41.955,19.675 41.955,18.14 v1(41.968,18.127) ; v1(48.8,17) 48.815,17.015 49.585,17.015 R214C.1@49.6,17.03 ; C88C.1@50.8,17.05 51.419,17.05 v1(51.735,16.734) ; v1(53.9,17.3) 53.888,17.312 53.888,18.001 C76C.1@53.876,18.013 54.151,18.288 IC52C.2@54.151,19.688 ; IC52C.8@61.771,19.688 61.771,18.029 v1(61.8,18) ; v1(74.2,20.9) 74.239,20.861 IC1C.4@75.475,20.861 ; v1(75,19.8) 75,20.386 IC1C.4@75.475,20.861 ; v1(75,22) 75,21.336 IC1C.4@75.475,20.861 ; IC12C.4@75.679,20.861 IC1C.4@75.475,20.861 ; IC1C.4@75.925,20.861 76.4,21.336 v1(76.4,22) ; v1(76.5,19.8) 76.448,19.852 76.448,20.386 75.973,20.861 77.161,20.861 v1(77.2,20.9) ; v1(77.8,14.3) 77.85,14.35 C43C.1@78.7,14.35 78.708,14.342 78.708,13.595 v1(78.715,13.587) ; v1(79.1,13) C42C.2@79.9,13 ; v1(79.9,12.2) C42C.2@79.9,13.1 ; C42C.2@80.4,13.6 80.9,13.1 80.9,12.679 v1(80.9,12.2) ; R219C.2@14,36.07 14.98,36.07 C95C.1@15,36.05
  TopLayer w0.5: v1(20.6,36.2) 20.627,36.2 20.672,36.155 IC50C.5@22.15,36.155 ; v1(20.713,39.984) 20.725,39.972 22.144,39.972 IC50C.2@22.15,39.965 ; IC50C.11@22.15,28.535 22.158,28.527 23.546,28.527 23.573,28.5 v1(23.6,28.5) ; IC50C.8@22.15,32.345 23.718,32.345 23.773,32.4 v1(23.8,32.4)
  TopLayer w0.6: R206C.1@19.87,32.345 IC50C.8@21.45,32.345 ; R210C.1@19.88,28.535 20.636,28.535 v1(20.651,28.55) 20.665,28.535 IC50C.11@22.15,28.535 ; IC50C.8@21.45,32.345 IC50C.8@22.15,32.345
  Bottom Layer w0.25: LD15C.1@-5.1,41 v1(-4.2,41.9) ; v1(8.8,28.1) 8.85,28.05 T21C.2@9.95,28.05 ; v1(8.8,30.8) 8.867,30.867 8.967,30.867 9.75,31.65 T23C.2@9.95,31.65 ; v1(13.8,30.5) 13.8,29.8 T22C.2@13.85,29.75 ; R223C.1@13.87,32.9 13.87,34.17 v1(13.9,34.2) ; v1(80.2,22.5) 80.224,22.524 81.574,22.524 R69C.2@81.6,22.55 81.45,22.55 81,22.1 v1(81,21.5) ; R69C.2@81.85,22.524 82.976,22.524 v1(83,22.5) ; R69C.2@81.85,22.55 82.3,22.1 v1(82.3,21.5)
  other v1: 42.168,3.35 43.418,5.85 42.168,8.35 38.418,10.85 43.418,10.85 50.918,10.85 59.668,13.35 64.668,13.35 67.168,13.35 69.668,13.35 72.168,13.35 74.668,13.35 77.168,13.35 40.918,15.828 43.418,15.828 68.418,15.85 70.918,15.85 82.168,18.35 40.97,20.85 78.418,20.85 83.418,20.85 -1.582,25.85 3.418,25.85 5.918,25.85 -1.582,30.85 38.418,30.85 20.7,32.4 27.168,33.35 39.668,33.35 10.918,35.85 18.418,35.85 25.918,35.85 28.418,35.85 -0.332,38.35 4.668,38.35 7.168,38.35 9.668,38.35 12.168,38.35 14.668,38.35 17.168,38.35 19.668,38.35 24.668,38.35 27.168,38.35 29.668,38.35 34.668,38.35 8.418,40.85 10.918,40.85 13.418,40.85 15.918,40.85 18.418,40.85 25.918,40.85 33.418,40.85 35.918,40.85
GND_ISO4: C32D.1 C33D.1 C42D.2 C43D.1 C56D.1 C76D.1 C88D.1 C95D.1 C100D.1 D3D.1 IC1D.4 IC12D.4 IC29D.1 IC50D.2 IC50D.5 IC50D.8 IC50D.11 IC52D.2 IC52D.8 IC53D.9 J15D.2 J16D.2 LD15D.1 LD16D.1 R69D.2 R202D.1 R206D.1 R210D.1 R214D.1 R218D.2 R219D.2 R223D.1 T19D.2 T20D.2 T21D.2 T22D.2 T23D.2 TP1D.1 | length 56.3
  TopLayer w0.2: LD16D.1@-5.1,19 -4.5,19 -4.024,19.476 -4.024,19.876 v1(-4,19.9) ; T19D.2@12.894,17.45 12.894,16.606 v1(12.9,16.6) ; v1(13.09,7.934) 13.198,7.934 13.363,7.77 R218D.2@14.2,7.77 ; v1(14.2,17.9) 14.2,17.155 C95D.1@14.187,17.142 15.088,17.142 R219D.2@15.107,17.161 15.127,17.18 15.88,17.18 v1(15.9,17.2) ; R218D.2@14.331,7.727 14.353,7.75 C100D.1@15.2,7.75 15.8,8.35 15.8,8.55 v1(15.8,9.2) ; v1(27,3) 27.028,3.028 C56D.1@27.848,3.028 ; IC29D.1@31.45,2.95 31.5,3 v1(31.5,3.7) ; R202D.1@32.37,6.2 32.405,6.235 v1(33.123,6.235) ; v1(34.124,17.268) 34.124,18.03 C32D.1@34.129,18.035 ; C33D.1@34.183,11.65 34.183,12.483 v1(34.2,12.5)
  TopLayer w0.25: D3D.1@3.95,10.607 D3D.1@3.95,10.6 3.963,10.613 v2(3.963,11.305)
  TopLayer w0.3: IC50D.5@22.147,16.711 23.789,16.711 v1(23.8,16.7) ; IC50D.2@22.147,20.521 23.879,20.521 v1(23.9,20.5) ; v1(90.1,7.8) 90.127,7.827 90.127,9.247 IC53D.9@90.155,9.275 ; v1(97,6.6) 97.015,6.615 97.785,6.615 R214D.1@97.8,6.63 ; C88D.1@99,6.65 99.025,6.625 99.795,6.625 v1(99.796,6.624) ; v1(102.2,6.9) C76D.1@102.2,7.633 ; C76D.1@102.2,7.633 102.475,7.908 IC52D.2@102.475,9.308 ; IC52D.8@110.095,9.308 110.103,9.3 110.881,9.3 v1(110.893,9.287) ; v1(122.6,15.4) IC1D.4@123.349,15.4 ; v1(123.3,14.6) 123.3,15.351 IC1D.4@123.349,15.4 ; v1(124.1,16.7) 124.087,16.687 124.087,15.734 IC1D.4@124.054,15.701 ; v1(124.9,14.7) 124.876,14.724 124.876,15.351 124.526,15.701 125.599,15.701 v1(125.6,15.7) ; v1(128.1,10.5) 128.15,10.45 C43D.1@129,10.45 129,11.05 128.7,11.35 v1(128.7,11.4) ; v1(129.6,11.3) 129.95,10.95 130.425,10.95 C42D.2@130.5,10.875 ; v1(130.5,11.6) C42D.2@130.5,10.875 ; C42D.2@130.9,10.2 130.5,10.6 C42D.2@130.5,10.875 ; v1(131.6,11.6) 131.6,11.126 131.424,10.95 131.375,10.95 130.9,10.475 C42D.2@130.5,10.875 ; IC1D.4@123.349,15.4 123.65,15.701 IC1D.4@124.054,15.701 ; IC1D.4@123.349,15.4 123.753,15.4 IC1D.4@124.054,15.701
  TopLayer w0.5: T20D.2@12.883,8.7 12.883,9.783 v1(12.9,9.8) ; IC50D.8@22.147,12.901 23.599,12.901 v1(23.6,12.9)
  TopLayer w0.6: R210D.1@19.88,9.092 v1(20.575,9.092) 22.138,9.092 IC50D.11@22.147,9.091 23.691,9.091 v1(23.7,9.1) ; R206D.1@19.88,12.893 v1(20.659,12.893) ; v1@20.668,12.901 IC50D.8@22.147,12.901
  Bottom Layer w0.2: LD15D.1@-5.1,21 v1(-4.1,21) ; v1(7.8,9.3) T21D.2@8.891,9.3 ; T23D.2@8.807,12.831 8.831,12.831 9.275,13.275 9.275,13.299 v1(10.1,14.124) ; R223D.1@12.87,14.3 v1(13.6,14.3) ; T22D.2@12.892,11.16 12.892,11.992 v1(12.9,12)
  Bottom Layer w0.3: v1(128.9,16.3) 128.914,16.314 R69D.2@129.989,16.314 ; v1(129.6,15.2) 129.6,15.925 R69D.2@129.989,16.314 ; R69D.2@130.025,16.314 R69D.2@129.989,16.314 ; R69D.2@130.025,16.35 R69D.2@129.989,16.314 ; v1(131,15.2) 131,15.925 130.575,16.35 R69D.2@130.3,16.35 130.35,16.4 v1(131.8,16.4)
  other v1: 23.418,0.85 85.918,0.85 88.418,0.85 22.168,3.35 87.168,3.35 89.668,3.35 92.168,3.35 -1.582,5.85 3.418,5.85 5.918,5.85 115.918,5.85 118.418,5.85 120.918,5.85 123.418,5.85 58.265,6.003 -1.582,10.85 127.168,13.35 25.918,15.85 28.418,15.85 -0.332,18.35 4.668,18.35 7.168,18.35 9.668,18.35 12.168,18.35 14.668,18.35 17.168,18.35 19.668,18.35 24.668,18.35 29.668,18.35 8.418,20.85 10.918,20.85 13.418,20.85 15.918,20.85 18.418,20.85 25.918,20.85 33.418,20.85
IN_CH9: IC3.36 J1.6 | length 24.2
  TopLayer w0.15: IC3.36@125.158,66.017 124.878,66.017 123.401,64.54 123.401,62.755 125.556,60.6 131.1,60.6 132.7,59 132.7,57.312 135.1,54.912 135.1,52.7 134.788,52.388 J1.6@133.35,52.388
IN_CH10: IC3.33 J1.7 | length 21.8
  TopLayer w0.15: IC3.33@125.158,67.517 123.617,67.517 122.241,66.141 122.241,60.559 126.4,56.4 v1(126.4,53.9) ; v1(126.4,51.8) 126.448,51.753 J1.7@128.65,51.753
  Bottom Layer w0.15: v1(126.4,51.8) v1(126.4,53.9)
IN_CH11: IC3.29 J1.16 | length 35.4
  TopLayer w0.15: v1(124.835,52.466) 124.842,52.473 124.842,54.958 121.031,58.769 121.031,67.831 122.717,69.517 IC3.29@125.158,69.517 ; J1.16@133.35,49.213 135.187,49.213 v1(135.2,49.2)
  Bottom Layer w0.15: v1(124.835,52.466) 124.835,52.409 126.249,50.995 133.405,50.995 v1(135.2,49.2)
IN_CH12: IC3.26 J1.17 | length 31.7
  TopLayer w0.15: IC3.26@125.158,71.017 124.21,71.017 124.207,71.02 122.112,71.02 119.888,68.795 119.888,57.112 122.911,54.088 122.911,51.489 125.822,48.578 J1.17@128.65,48.578
IN_CH13: IC13.36 J1.42 | length 27.9
  TopLayer w0.12: J1.42@133.35,40.958 135.842,40.958 137.2,39.6 v1(137.2,29.4) ; v1(137.2,23.6) 137.2,22.3 139.431,20.069 IC13.36@142.45,20.069
  Bottom Layer w0.12: v1(137.2,23.6) v1(137.2,29.4)
IN_CH14: IC13.33 J1.43 | length 30.7
  TopLayer w0.12: v1(126.666,34.691) 125.918,35.439 125.918,39.418 126.822,40.323 J1.43@128.65,40.323 ; v1(128.638,32.73) 128.7,32.668 128.7,30.444 130.344,28.8 132.8,28.8 140.031,21.569 IC13.33@142.45,21.569
  Bottom Layer w0.12: v1(126.666,34.691) 127.829,33.529 127.829,33.519 128.618,32.73 v1(128.638,32.73)
IN_CH15: IC13.29 J1.52 | length 20.1
  TopLayer w0.12: 135.929,28.157 140.518,23.569 IC13.29@142.45,23.569
  TopLayer w0.127: J1.52@133.35,37.783 135.018,37.783 135.929,36.871 135.929,28.157
IN_CH16: IC13.26 J1.53 | length 22.5
  TopLayer w0.12: J1.53@128.65,37.148 130.471,37.148 130.91,36.709 130.91,34.79 v1(133.1,32.6) ; v1(139.1,31.4) 139.136,31.4 139.719,30.818 139.719,26.419 141.069,25.069 IC13.26@142.45,25.069
  Bottom Layer w0.12: v1(133.1,32.6) 137.9,32.6 v1(139.1,31.4)
INT_I2C.SCL: T_IC9.3 T_R68.1 U1.14 U2.14 U3.14 U4.14 | length 79.7
  TopLayer w0.15: v1(151.281,40.314) 151.281,42.226 U4.14@151.305,42.25 ; T_IC9.3@158.15,38.3 159.127,38.3 v1(159.436,38.609) 159.475,38.57 160.395,38.57 160.61,38.785 160.61,38.805 162.868,41.063 162.868,42.245 U2.14@162.873,42.25
  TopLayer w0.2: U3.14@96.33,41.55 96.33,43.93 v1(96.4,44) ; v1(117.2,44.2) 117.2,42.255 U1.14@117.205,42.25
  L4 w0.15: 149.249,41.04 150.555,41.04 v1(151.281,40.314) 151.308,40.341 154.259,40.341 154.897,39.703 154.897,39.422 155.534,38.784 155.816,38.784 155.991,38.609 v1(159.436,38.609)
  L4 w0.2: v1(96.4,44) 98.4,44 99.386,44.986 116.414,44.986 v1(117.2,44.2) 120.36,41.04 149.249,41.04
INT_I2C.SDA: T_IC9.2 T_R67.1 U1.15 U2.15 U3.15 U4.15 | length 84.9
  TopLayer w0.15: v1(152.568,39.846) 152.575,39.853 152.575,44.175 v1(152.6,44.2) ; T_IC9.2@158.182,37.921 158.182,37.178 v1(158.22,37.139) ; v1@158.207,37.127 158.604,36.73 T_R67.1@159.475,36.73 160.76,36.73 160.803,36.774 160.805,36.776 160.807,36.777 161.155,37.148 161.155,37.967 164.063,40.874 164.063,41.279 U2.15@164.143,41.359
  TopLayer w0.2: v1(97.4,44.8) 97.452,44.748 U3.15@97.452,41.517 ; U1.15@118.475,42.25 118.5,42.275 118.5,45.141 v1(118.483,45.158)
  L4 w0.15: v1(152.568,39.846) 153.513,38.9 154.544,38.9 155.466,37.978 157.356,37.978 158.195,37.139 v1(158.22,37.139)
  L4 w0.2: v1(97.4,44.8) 98.406,45.806 117.835,45.806 v1(118.483,45.158) 121.561,42.08 150.48,42.08 v1(152.6,44.2)
IO0A: D3A.3 J15A.1 R203A.1 R207A.2 | length 17.1
  TopLayer w0.175: J15A.1@1.9,80.3 1.9,77.6 5.439,74.061 5.439,73.811 D3A.3@5.65,73.6 7.683,73.6 R207A.2@8.033,73.95 R203A.1@14.4,73.95
IO0B: D3B.3 J15B.1 R203B.1 R207B.2 | length 17.1
  TopLayer w0.175: J15B.1@1.9,60.3 1.9,57.35 D3B.3@5.65,53.6 7.683,53.6 R207B.2@8.033,53.95 R203B.1@14.4,53.95
IO0C: D3C.3 J15C.1 R203C.1 R207C.2 | length 17.6
  TopLayer w0.175: J15C.1@1.9,38.5 1.9,35.55 D3C.3@5.65,31.8 6.908,31.8 7.258,32.15 R203C.1@14.4,32.15 ; R203C.1@14.6,32.15 R203C.1@14.4,32.15 ; R203C.1@14.6,32.35 R203C.1@14.4,32.15
IO0D: D3D.3 J15D.1 R203D.1 R207D.2 | length 17.2
  TopLayer w0.175: J15D.1@1.9,18.5 1.9,16.1 5.077,12.923 5.19,12.81 5.44,12.81 D3D.3@5.65,12.6 5.85,12.8 6.768,12.8 6.871,12.903 6.871,12.963 7.358,13.45 14.112,13.45 14.6,13.938 R203D.1@14.6,13.95
IO1A: D3A.2 J16A.1 R208A.1 R211A.2 | length 17.4
  TopLayer w0.175: J16A.1@-1.6,70.3 4.35,70.3 D3A.2@5.65,71.6 6.708,71.6 7.258,71.05 R211A.2@8.033,71.05 14.112,71.05 14.6,70.563 R208A.1@14.6,70.35
IO1B: D3B.2 J16B.1 R208B.1 R211B.2 | length 16.1
  TopLayer w0.175: J16B.1@-1.6,50.3 4.35,50.3 D3B.2@5.65,51.6 5.713,51.537 6.863,51.537 R211B.2@7.4,51 ; R211B.2@8.039,51.056 R208B.1@14.375,51.056
IO1C: D3C.2 J16C.1 R208C.1 R211C.2 | length 17.5
  TopLayer w0.175: J16C.1@-1.6,28.5 4.35,28.5 D3C.2@5.65,29.8 6.708,29.8 7.258,29.25 R211C.2@8.033,29.25 ; R211C.2@8.039,29.256 14.375,29.256 14.6,29.031 R208C.1@14.6,28.55
IO1D: D3D.2 J16D.1 R208D.1 R211D.2 | length 17
  TopLayer w0.175: J16D.1@-1.6,8.5 3.596,8.5 D3D.2@5.434,10.337 ; D3D.2@5.434,10.837 D3D.2@5.437,10.837 ; D3D.2@5.65,10.6 5.7,10.65 R211D.2@8.133,10.65 14.112,10.65 14.6,10.163 R208D.1@14.6,10.133
LED0A: LD15A.2 R212A.2 | length 1.8
  Bottom Layer w0.25: LD15A.2@-5.1,80.8 -4.875,80.8 -4.865,80.81 -4.039,80.81 -4.029,80.8 R212A.2@-3.27,80.8
LED0B: LD15B.2 R212B.2 | length 1.9
  Bottom Layer w0.25: LD15B.2@-5.1,60.8 -4.571,60.8 -4.526,60.845 -4.074,60.845 -4.029,60.8 R212B.2@-3.27,60.8
LED0C: LD15C.2 R212C.2 | length 1.9
  Bottom Layer w0.25: LD15C.2@-5.1,39 -4.571,39 -4.526,39.045 -4.074,39.045 -4.029,39 R212C.2@-3.27,39
LED0D: LD15D.2 R212D.2 | length 1.8
  Bottom Layer w0.25: LD15D.2@-5.1,19 R212D.2@-3.3,19
LED1A: LD16A.2 R213A.2 | length 1.2
  TopLayer w0.25: LD16A.2@-5.1,82.8 R213A.2@-3.87,82.8
LED1B: LD16B.2 R213B.2 | length 1.2
  TopLayer w0.25: LD16B.2@-5.1,62.8 R213B.2@-3.87,62.8
LED1C: LD16C.2 R213C.2 | length 1.3
  TopLayer w0.25: LD16C.2@-5.1,41 -3.87,41 R213C.2@-3.8,41.07
LED1D: LD16D.2 R213D.2 | length 1.8
  TopLayer w0.25: LD16D.2@-5.1,21 -5.1,21.8 -4.8,22.1 R213D.2@-4.27,22.1
LED_OUTA: B10A.1 IC54A.4 R216A.1 R222A.2 | length 97.7
  TopLayer w0.25: R216A.1@71.413,82.607 71.494,82.689 71.494,83.321 71.973,83.8 v1(72,83.8) ; IC54A.4@96.751,76.427 B10A.1@96.751,78.019 96.751,79.086 96.836,79.171 v1(96.836,79.265)
  Bottom Layer w0.25: R222A.2@16.983,73.444 16.983,73.464 17.148,73.629 17.168,73.629 33.139,89.6 55.6,89.6 62.623,82.577 68.204,82.577 70.427,84.8 71.638,84.8 72,84.438 v1(72,83.8) 74.849,83.8 75.225,84.176 87.484,84.176 92.394,79.265 v1(96.836,79.265)
LED_OUTB: B10B.1 IC54B.4 R216B.1 R222B.2 | length 60.7
  TopLayer w0.25: R216B.1@47.304,48.1 v1(48.2,48.1) ; v1(69.8,49.6) 69.8,49.695 69.9,49.795 B10B.1@69.9,50.896 69.9,52.679 IC54B.4@69.899,52.68
  Bottom Layer w0.25: R222B.2@16.983,53.444 17.009,53.418 28.082,53.418 28.6,52.9 34.821,52.9 37.921,49.8 46.5,49.8 v1(48.2,48.1) 49.2,47.1 55.248,47.1 57.662,49.513 59.723,49.513 59.937,49.3 69.479,49.3 69.779,49.6 v1(69.8,49.6)
LED_OUTC: B10C.1 IC54C.4 R216C.1 R222C.2 | length 66.9
  TopLayer w0.25: v1(37.2,25.2) 39.2,23.2 39.2,17.969 40.717,16.451 45.326,16.451 45.905,17.03 R216C.1@47,17.03 v1(47,16.2) ; IC54C.4@69.462,21.187 69.5,21.149 v1(69.5,18)
  Bottom Layer w0.25: R222C.2@16.983,31.644 25.256,31.644 28.7,28.2 34.2,28.2 v1(37.2,25.2) ; v1(47,16.2) 51.498,16.2 51.509,16.189 51.961,16.189 51.972,16.2 67.7,16.2 v1(69.5,18)